# Altium PCB AD.PcbDoc
Units mm, origin at the board's own origin, x right, y up, seen from the top; angles counter-clockwise.
Board outline 100.31 x 90.32 mm, 2 copper layers (Top Layer, Bottom Layer); 9 components, 15 nets, 116 pads, 0 vias.
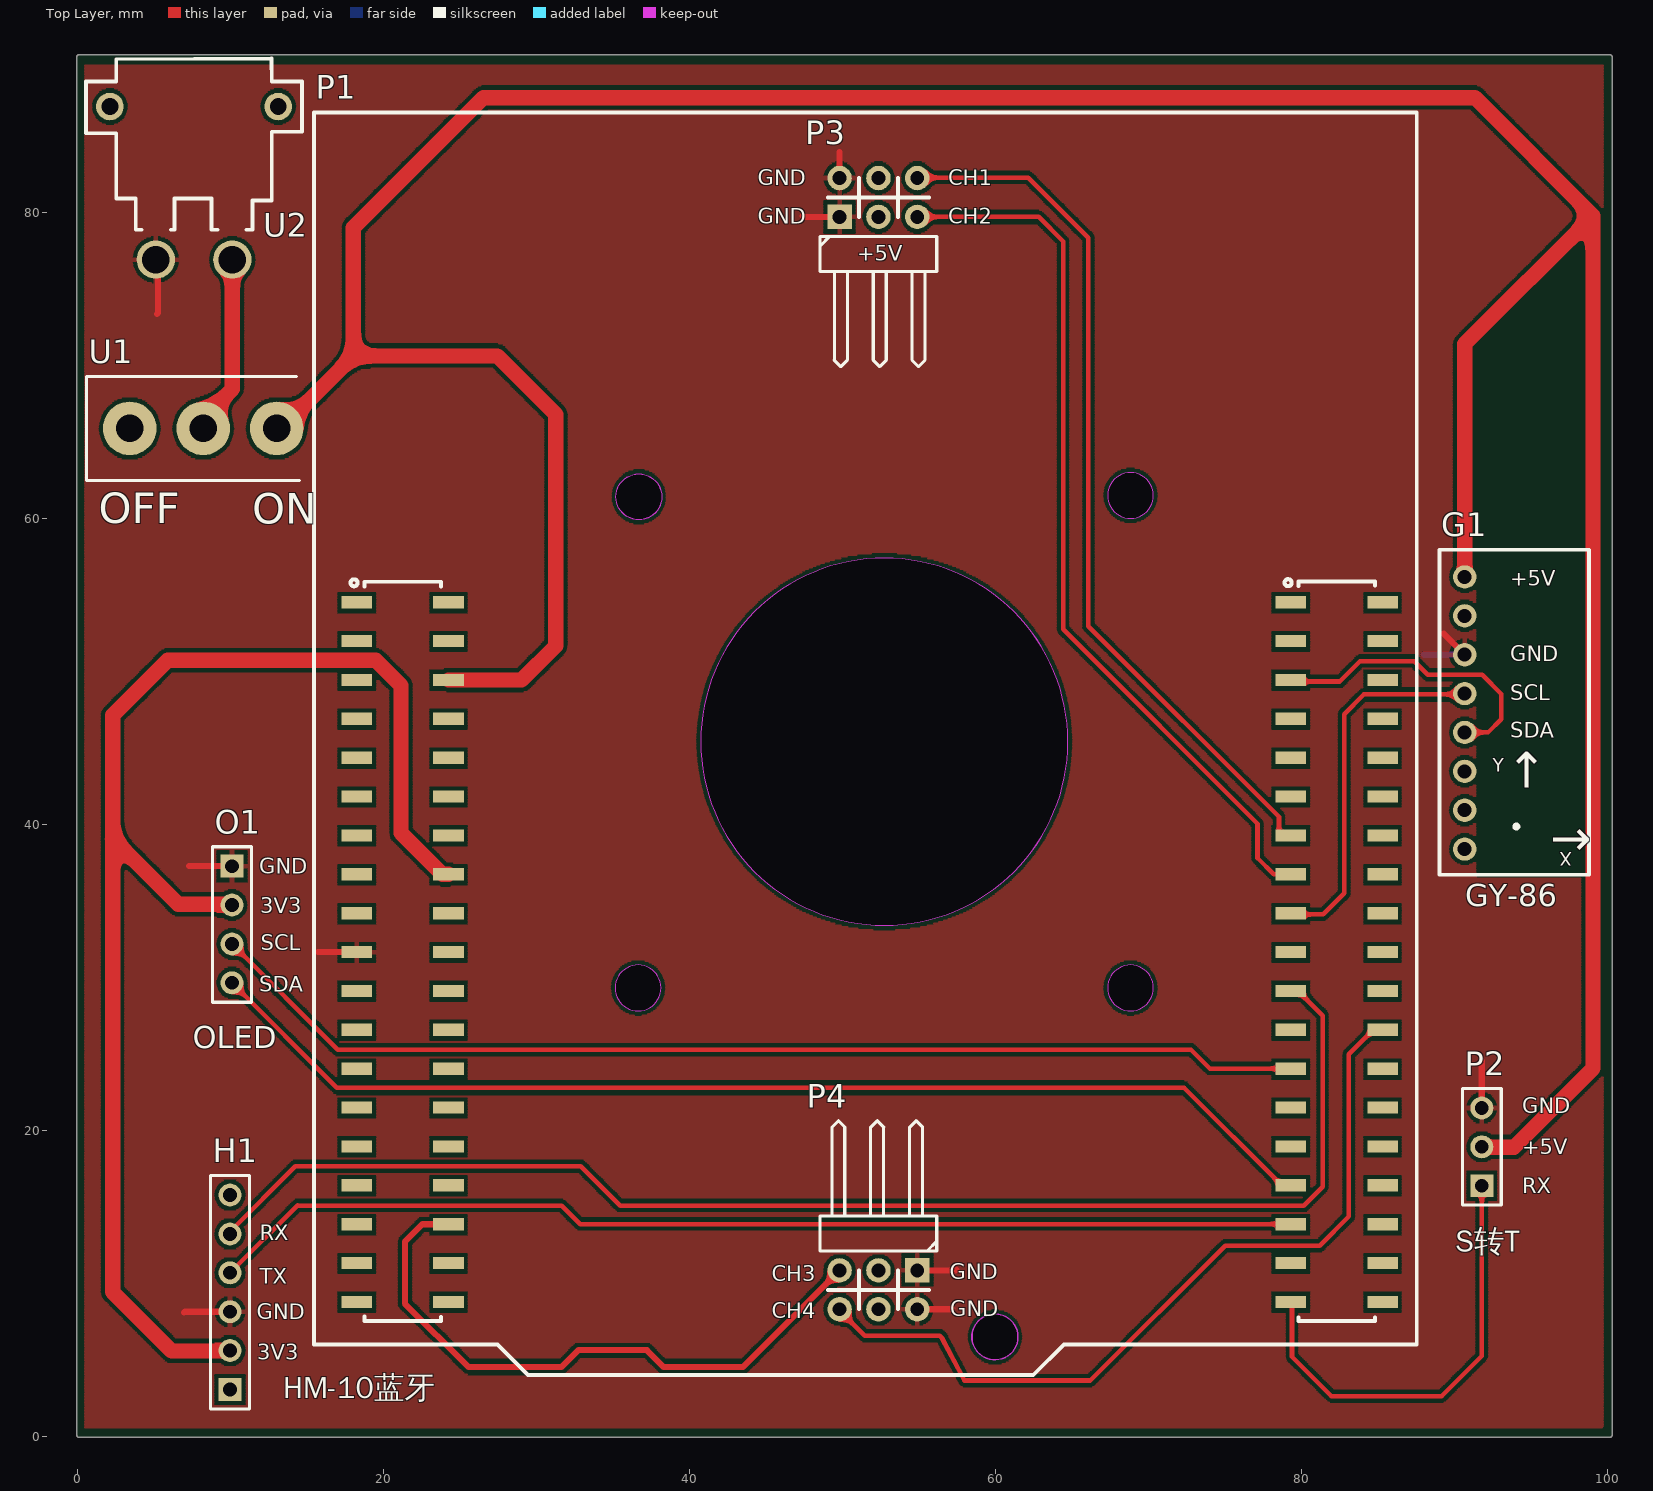
[diagram p0: Top Layer view]
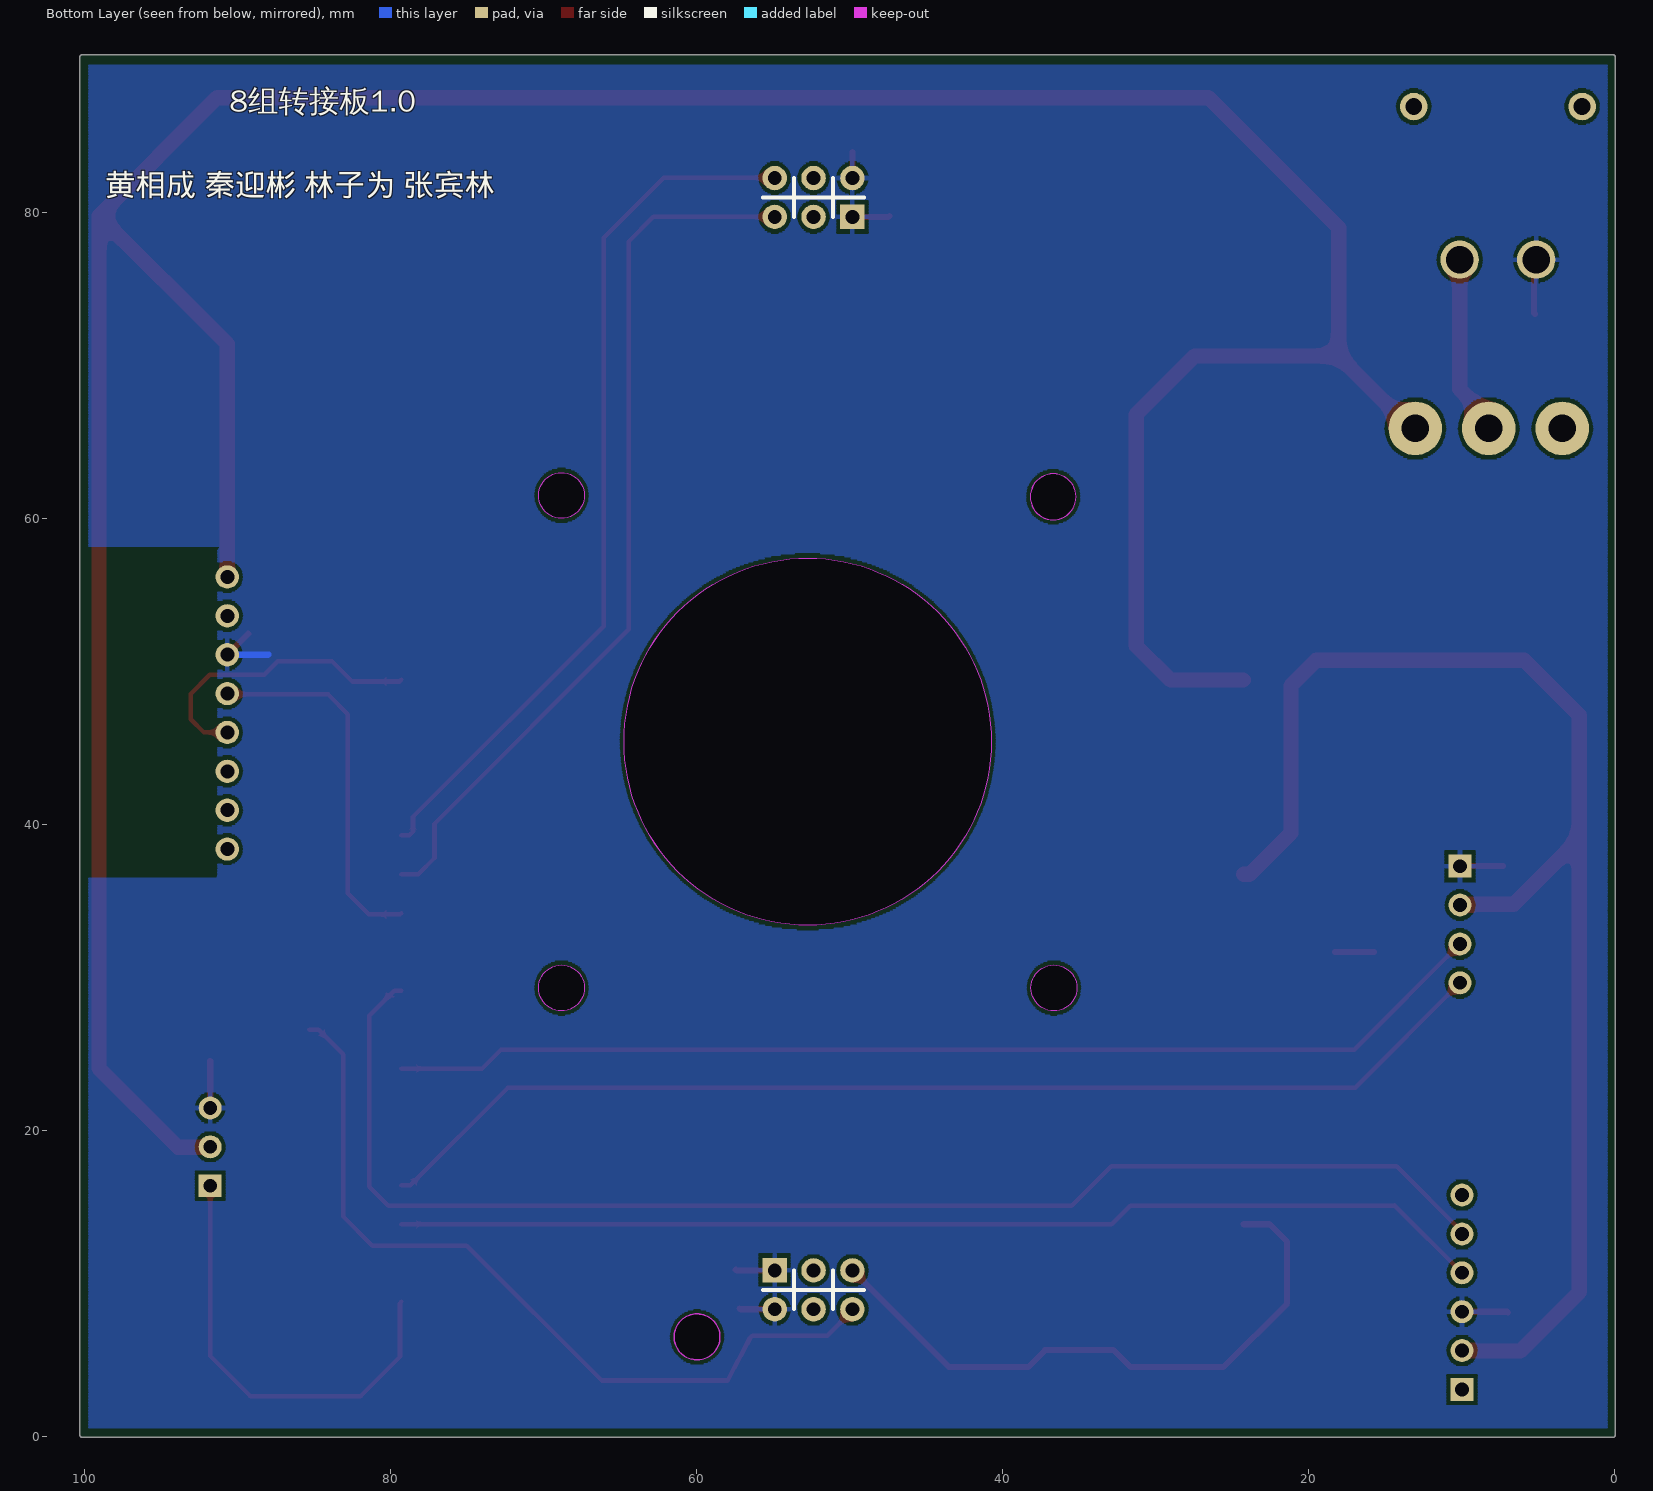
[diagram p1: Bottom Layer view, seen from below]

## Layer stack, top to bottom
Top Solder: solder mask 0.0102, Solder Resist, Dk 3.5
Top Layer: signal copper 0.0356
Dielectric 1: dielectric 0.32, FR-4, Dk 4.8
Bottom Layer: signal copper 0.0356
Bottom Solder: solder mask 0.0102, Solder Resist, Dk 3.5

## Board outline
-0.026,0.076 ccw(c0.102,0.076) 0.102,-0.051 100.152,-0.051 ccw(c100.152,0.076) 100.28,0.076 100.28,90.145 ccw(c100.152,90.145) 100.152,90.272 0.102,90.272 ccw(c0.102,90.145) -0.026,90.145
cut-out: 67.317,61.482 ccw(c68.817,61.482) 68.817,59.982 ccw(c68.817,61.482) 70.317,61.482 ccw(c68.817,61.482) 68.817,62.982 ccw(c68.817,61.482)
cut-out: 67.317,29.308 ccw(c68.817,29.308) 68.817,27.808 ccw(c68.817,29.308) 70.317,29.308 ccw(c68.817,29.308) 68.817,30.808 ccw(c68.817,29.308)
cut-out: 35.143,29.308 ccw(c36.643,29.308) 36.643,27.808 ccw(c36.643,29.308) 38.143,29.308 ccw(c36.643,29.308) 36.643,30.808 ccw(c36.643,29.308)
cut-out: 36.69,59.899 cw(c36.69,61.399) 35.19,61.399 cw(c36.69,61.399) 36.69,62.899 cw(c36.69,61.399) 38.19,61.399 cw(c36.69,61.399)
cut-out: 40.73,45.395 ccw(c52.73,45.395) 52.73,33.395 ccw(c52.73,45.395) 64.73,45.395 ccw(c52.73,45.395) 52.73,57.395 ccw(c52.73,45.395)
cut-out: 36.69,59.89 cw(c36.69,61.39) 35.19,61.39 cw(c36.69,61.39) 36.69,62.89 cw(c36.69,61.39) 38.19,61.39 cw(c36.69,61.39)
cut-out: 35.143,29.308 ccw(c36.643,29.308) 36.643,27.808 ccw(c36.643,29.308) 38.143,29.308 ccw(c36.643,29.308) 36.643,30.808 ccw(c36.643,29.308)
cut-out: 67.317,61.482 ccw(c68.817,61.482) 68.817,59.982 ccw(c68.817,61.482) 70.317,61.482 ccw(c68.817,61.482) 68.817,62.982 ccw(c68.817,61.482)
cut-out: 67.317,29.308 ccw(c68.817,29.308) 68.817,27.808 ccw(c68.817,29.308) 70.317,29.308 ccw(c68.817,29.308) 68.817,30.808 ccw(c68.817,29.308)
cut-out: 40.73,45.395 ccw(c52.73,45.395) 52.73,33.395 ccw(c52.73,45.395) 64.73,45.395 ccw(c52.73,45.395) 52.73,57.395 ccw(c52.73,45.395)

## Design rules (kind name [scope] priority, off if disabled: settings)
Clearance GND_Polygon_Clearance [InNet('GND')] p1: gap=0.25 ignorepadtopadclearanceinfootprint=FALSE
Clearance [All] p2: gap=0.3 ignorepadtopadclearanceinfootprint=FALSE
PolygonConnect PolygonGND [InNet('GND')] p1: connectstyle=Relief reliefconductorwidth=0.3 reliefentries=4 polygonreliefangle="90 Angle" airgapwidth=0.25
PolygonConnect [All] p2: connectstyle=Relief reliefconductorwidth=0.254 reliefentries=4 polygonreliefangle="90 Angle" airgapwidth=0.254
RoutingVias [All] p1: holewidth=0.305 width=0.61 viastyle="Through Hole" minholewidth=0.305 minwidth=0.61 maxholewidth=0.305 maxwidth=0.61
SolderMaskExpansion [All] p1: expansion=0.064 istentingtop=FALSE
SupplyNets "Schematic Supply Nets_2" [InNet('+3V3')] p1: voltage=0.000
SupplyNets "Schematic Supply Nets_1" [InNet('+5')] p2: voltage=0.000
SupplyNets "Schematic Supply Nets" [InNet('GND')] p3: voltage=0.000
Width Width_PWR [InNetClass('PWR')] p1: maxlimit=1.524 minlimit=0.305 preferedwidth=0.305
Width Width_INF [InNetClass('INF')] p2: maxlimit=0.4 minlimit=0.2 preferedwidth=0.2
Width Width_PWM [InNetClass('PWM')] p3: maxlimit=0.4 minlimit=0.2 preferedwidth=0.2
Width [All] p4: maxlimit=0.254 minlimit=0.254 preferedwidth=0.254
30 further rules are at their usual default settings.

## Classes and differential pairs
net class PWM: TIM3_CH1 TIM3_CH2 TIM3_CH3 TIM3_CH4
net class INF: I2C1_SCL I2C1_SDA I2C2_SCL I2C2_SDA USART1_RX USART1_TX USART2_RX
net class PWR: +3V3 +5 GND NetU1_2

## Components (designator, comment, footprint, x,y, rotation, side; value= is the part's Value field where it differs from the comment)
G1 "GY-86" GY-86 95.733,47.269 r0 top
H1 "HM-10" HDR1X6 9.982,3.073 r90 top
O1 "OLED" HDR1X4 10.109,37.262 r270 top
P1 "NUCLEO-64" NUCLEO-F103RB 87.568,86.508 r270 top
P2 "SBUS转TTL" HDR1X3 91.77,16.383 r90 top
P3 "PWM" HDR2.54-WI-2x3P 52.349,80.955 r0 top
P4 "PWM" HDR2.54-WI-2x3P 52.349,9.581 r180 top
U1 "SS12D06-开关" SS12D06开关 8.23,65.862 r90 top
U2 "XT30PW" XT-30PW 10.132,76.893 r180 top

## Footprints (in the part's own frame and the unit in brackets; to place one, negate y for a bottom-side part, rotate by r counter-clockwise, add the part's x,y. Pads: shape width x height; smd on the part's side, far side on the other; paste and mask are expansions set on the pad)
GY-86 [mil]
  round 60 hole 36: 1(-200,350) 2(-200,250) 3(-200,150) 4(-200,50) 5(-200,-50) 6(-200,-150) 7(-200,-250) 8(-200,-350)
  silkscreen extent -265,-416 120,420
HDR1X3 [mm] "Connector; Header; 3 Position"
  rect 1.5x1.5 hole 0.9: 1(0,0)
  round 1.5 hole 0.9: 2(2.54,0) 3(5.08,0)
  silkscreen extent -1.27,-1.27 6.35,1.27, body extent -1.27,-1.27 6.35,1.27, height 8.5
HDR1X4 [mm] "Connector; Header; 4 Position"
  rect 1.5x1.5 hole 0.9: 1(0,0)
  round 1.5 hole 0.9: 2(2.54,0) 3(5.08,0) 4(7.62,0)
  silkscreen extent -1.27,-1.27 8.89,1.27
HDR1X6 [mm] "Connector; Header; 6 Position"
  rect 1.5x1.5 hole 0.9: 1(0,0)
  round 1.5 hole 0.9: 2(2.54,0) 3(5.08,0) 4(7.62,0) 5(10.16,0) 6(12.7,0)
  silkscreen extent -1.27,-1.27 13.97,1.27, body extent -1.27,-1.27 13.97,1.27, height 8.5
HDR2.54-WI-2x3P [mm] "双排弯脚排针，3x2脚"
  rect 1.6x1.6 hole 0.9: 1(-2.54,-1.27)
  round 1.6 hole 0.9: 2(-2.54,1.27) 3(0,-1.27) 4(0,1.27) 5(2.54,-1.27) 6(2.54,1.27)
  silkscreen extent -3.81,-11.06 3.81,1.27, body extent -3.81,-10.49 3.81,2.36, height 5.1
NUCLEO-F103RB [mm]
  rect 0.8x2 smd paste+0 mask+0.051: 1(32,-69.308) 2(32,-63.308) 3(34.54,-69.308) 4(34.54,-63.308) 5(37.08,-69.308) 6(37.08,-63.308) 7(39.62,-69.308) 8(39.62,-63.308) 9(42.16,-69.308) 10(42.16,-63.308) 11(44.7,-69.308) 12(44.7,-63.308) 13(47.24,-69.308) 14(47.24,-63.308) 15(49.78,-69.308) 16(49.78,-63.308) 17(52.32,-69.308) 18(52.32,-63.308) 19(54.86,-69.308) 20(54.86,-63.308) 21(57.4,-69.308) 22(57.4,-63.308) 23(59.94,-69.308) 24(59.94,-63.308) 25(62.48,-69.308) 26(62.48,-63.308) 27(65.02,-69.308) 28(65.02,-63.308) 29(67.56,-69.308) 30(67.56,-63.308) 31(70.1,-69.308) 32(70.1,-63.308) 33(72.64,-69.308) 34(72.64,-63.308) 35(75.18,-69.308) 36(75.18,-63.308) 37(77.72,-69.308) 38(77.72,-63.308) 73(31.995,-8.282) 74(31.995,-2.282) 75(34.535,-8.282) 76(34.535,-2.282) 77(37.075,-8.282) 78(37.075,-2.282) 79(39.615,-8.282) 80(39.615,-2.282) 81(42.155,-8.282) 82(42.155,-2.282) 83(44.695,-8.282) 84(44.695,-2.282) 85(47.235,-8.282) 86(47.235,-2.282) 87(49.775,-8.282) 88(49.775,-2.282) 89(52.315,-8.282) 90(52.315,-2.282) 91(54.855,-8.282) 92(54.855,-2.282) 93(57.395,-8.282) 94(57.395,-2.282) 95(59.935,-8.282) 96(59.935,-2.282) 97(62.475,-8.282) 98(62.475,-2.282) 99(65.015,-8.282) 100(65.015,-2.282) 101(67.555,-8.282) 102(67.555,-2.282) 103(70.095,-8.282) 104(70.095,-2.282) 105(72.635,-8.282) 106(72.635,-2.282) 107(75.175,-8.282) 108(75.175,-2.282) 109(77.715,-8.282) 110(77.715,-2.282)
  Keep-Out Layer board cut-out: 81.5,-27.608 81.5,-27.756 81.442,-28.046 81.329,-28.319 81.165,-28.564 80.956,-28.773 80.71,-28.938 80.437,-29.051 80.148,-29.108 79.852,-29.108 79.562,-29.051 79.289,-28.938 79.044,-28.773 78.835,-28.564 78.671,-28.319 78.557,-28.046 78.5,-27.756 78.5,-27.608 78.5,-27.461 78.557,-27.171 78.671,-26.898 78.835,-26.652 79.044,-26.443 79.289,-26.279 79.562,-26.166 79.852,-26.108 80.148,-26.108 80.437,-26.166 80.71,-26.279 80.956,-26.443 81.165,-26.652 81.329,-26.898 81.442,-27.171 81.5,-27.461 81.5,-27.608 81.5,-27.608
  Keep-Out Layer circle w0.003: c80,-27.608 r1.5
  Keep-Out Layer region: 81.5,-27.608 81.49,-27.782 81.459,-27.954 81.409,-28.121 81.34,-28.281 81.253,-28.433 81.149,-28.572 81.029,-28.699 80.896,-28.811 80.75,-28.907 80.594,-28.986 80.43,-29.045 80.26,-29.085 80.087,-29.106 79.913,-29.106 79.739,-29.085 79.57,-29.045 79.406,-28.986 79.25,-28.907 79.104,-28.811 78.97,-28.699 78.851,-28.572 78.747,-28.433 78.659,-28.281 78.59,-28.121 78.54,-27.954 78.51,-27.782 78.5,-27.608 78.51,-27.434 78.54,-27.262 78.59,-27.095 78.659,-26.935 78.747,-26.784 78.851,-26.644 78.97,-26.517 79.104,-26.405 79.25,-26.309 79.406,-26.231 79.57,-26.171 79.739,-26.131 79.913,-26.111 80.087,-26.111 80.26,-26.131 80.43,-26.171 80.594,-26.231 80.75,-26.309 80.896,-26.405 81.029,-26.517 81.149,-26.644 81.253,-26.784 81.34,-26.935 81.409,-27.095 81.459,-27.262 81.49,-27.434 81.5,-27.608
  Keep-Out Layer region: 81.5,-27.608 81.5,-27.756 81.442,-28.046 81.329,-28.319 81.165,-28.564 80.956,-28.773 80.71,-28.938 80.437,-29.051 80.148,-29.108 79.852,-29.108 79.562,-29.051 79.289,-28.938 79.044,-28.773 78.835,-28.564 78.671,-28.319 78.557,-28.046 78.5,-27.756 78.5,-27.608 78.5,-27.461 78.557,-27.171 78.671,-26.898 78.835,-26.652 79.044,-26.443 79.289,-26.279 79.562,-26.166 79.852,-26.108 80.148,-26.108 80.437,-26.166 80.71,-26.279 80.956,-26.443 81.165,-26.652 81.329,-26.898 81.442,-27.171 81.5,-27.461 81.5,-27.608 81.5,-27.608
  silkscreen extent 0,-72.11 82.5,-0.05
SS12D06开关 [mm]
  round 3.5 hole 1.8 paste-2539.97 mask+0.102: 1(0,4.8) 2(0,0) 3(0,-4.8)
  silkscreen extent -3.4,-6.3 3.4,7.62
XT-30PW [mm]
  round 2.5 hole 1.8 paste-2539.97 mask+0.051: 1(5,0) 2(0,0)
  round 1.8 hole 1.1 paste-2539.97 mask+0.051: 3(8,-10) 4(-3,-10)
  silkscreen extent -4.55,-13.15 9.55,-1.95

## Part data
G1: "GY-86模块", AddInBom=yes, Device=GY-86, FootprintName=GY-86, Symbol=GY-86
H1: "HM-10蓝牙模块", LatestRevisionDate=17-Jul-2002, LatestRevisionNote="Re-released for DXP Platform.", Publisher="Altium Limited"
O1: "使用I2C通信的0.96寸OLED模块", LatestRevisionDate=17-Jul-2002, LatestRevisionNote="Re-released for DXP Platform.", Publisher="Altium Limited"
P1: "STM32F401NUCLEO开发板", Manufacturer=ST, AddInBom=yes, Device=NUCLEO-64, FootprintName=NUCLEO-F103RB, Supplier=Mouser, SupplierPart=NUCLEO-F103rb, Symbol=NUCLEO-64
P2: "SBUS转TTL模块", LatestRevisionDate=17-Jul-2002, LatestRevisionNote="Re-released for DXP Platform.", Publisher="Altium Limited"
P3 P4: "电机PWM输出", LatestRevisionDate=17-Jul-2002, LatestRevisionNote="Re-released for DXP Platform.", Publisher="Altium Limited"
U1: library part SS12D06, "SS12D06开关", AddInBom=yes, Device=SS12D06-开关, FootprintName=SS12D06开关, OriginFootprint=SS12D06开关, Symbol=SS12D06-开关
U2: "XT-30插头", AddInBom=yes, Device=XT30PW, FootprintName=XT-30PW, OriginFootprint=XT-30PW, Symbol=XT30PW

## Nets (pads, with @x,y where several pads share a name; then routed paths per layer and width w, separated by ;. In a path a pad name is that pad's centre, name@x,y a point inside that pad or via, vN(x,y) a via of type N, cw(c..) or ccw(c..) an arc to the next point about the centre after c; other vN are vias at no path point)
+3V3: H1.2 O1.2 P1.16 | length 91.4
  Top Layer w1: H1.2 9.957,5.588 6.172,5.588 2.311,9.449 2.311,39.065 ; O1.2 10.058,34.773 6.604,34.773 2.311,39.065 ; P1.16 23.86,36.728 21.158,39.43 21.158,49.062 19.496,50.724 5.918,50.724 2.311,47.117 2.311,39.065
+5: G1.1 P1.6 P2.2 U1.3 | length 233.1
  Top Layer w1: U1.3 13.309,65.862 18.041,70.594 ; P1.6 29.032,49.428 31.267,51.664 31.267,66.777 27.45,70.594 18.041,70.594 ; G1.1 90.653,71.374 99.035,79.756 ; P2.2 91.796,18.898 93.878,18.898 99.035,24.054 99.035,79.756 ; 18.041,70.594 18.041,78.976 26.542,87.478 91.313,87.478 99.035,79.756
GND: G1.3 H1.3 O1.1 P1.19 P2.3 P3.1 P3.2 P4.1 P4.2 U2.1 | length 28.3
  Top Layer w0.4: 5.207,73.33 5.284,73.407 U2.1@5.284,76.512 ; 6.985,8.103 7.036,8.153 H1.3 ; 7.315,37.262 O1.1 ; 15.723,31.648 P1.19 ; 47.396,79.731 47.442,79.685 P3.1 ; P3.2 49.809,83.922 ; P4.2 57.129,8.311 57.175,8.357 ; P4.1 57.383,10.851 57.429,10.897 ; 89.281,52.451 G1.3 ; P2.3 91.77,24.536
  Bottom Layer w0.4: 87.96,51.105 87.986,51.079 G1.3
I2C1_SCL: G1.4 P1.89 | length 24.2
  Top Layer w0.3: P1.89 79.367,34.112 81.407,34.112 82.779,35.484 82.779,47.193 84.066,48.48 84.066,48.489 90.602,48.489 G1.4
I2C1_SDA: G1.5 P1.77 | length 19.6
  Top Layer w0.3: P1.77 79.393,49.327 82.489,49.327 83.811,50.65 87.358,50.65 88.249,49.759 91.796,49.759 93.04,48.514 93.04,46.863 92.177,45.999 G1.5
I2C2_SCL: O1.3 P1.97 | length 72.6
  Top Layer w0.3: O1.3 17.018,25.273 72.771,25.273 74.011,24.033 P1.97
I2C2_SDA: O1.4 P1.103 | length 74.7
  Top Layer w0.3: O1.4 16.967,22.784 72.316,22.784 78.686,16.413 P1.103
NetU1_2: U1.2 U2.2 | length 11.8
  Top Layer w1: U1.2 8.23,66.539 10.132,68.441 U2.2
TIM3_CH1: P1.85 P3.6 | length 57.6
  Top Layer w0.3: P3.6 54.914,82.249 62.128,82.249 66.065,78.312 66.065,52.942 78.518,40.49 78.518,39.523 78.768,39.273 P1.85
TIM3_CH2: P1.87 P3.5 | length 58.3
  Top Layer w0.3: P3.5 62.809,79.685 64.414,78.08 64.414,52.731 77.114,40.031 77.114,37.795 78.176,36.733 P1.87
TIM3_CH3: P1.34 P4.5 | length 41
  Top Layer w0.4: P1.34 22.555,13.868 21.412,12.725 21.412,8.687 25.552,4.547 31.648,4.547 32.741,5.639 37.211,5.639 38.303,4.547 43.505,4.547 P4.5
TIM3_CH4: P1.96 P4.6 | length 53.7
  Top Layer w0.3: P4.6 49.809,8.23 51.46,6.579 56.364,6.579 56.452,6.491 56.484,6.459 57.964,3.658 66.192,3.658 75.006,12.471 81.178,12.471 83.083,14.376 83.083,24.971 84.686,26.573 P1.96
USART1_RX: H1.4 P1.105 | length 71.6
  Top Layer w0.3: H1.4 14.402,15.113 14.427,15.088 31.648,15.088 32.863,13.873 P1.105
USART1_TX: H1.5 P1.93 | length 88.8
  Top Layer w0.3: H1.5 9.982,13.386 14.249,17.653 32.902,17.653 35.477,15.078 80.127,15.078 81.368,16.319 81.368,27.499 79.754,29.113 P1.93
USART2_RX: P1.109 P2.1 | length 29.3
  Top Layer w0.3: P1.109 79.368,8.711 79.368,5.214 81.94,2.642 89.154,2.642 91.77,5.258 P2.1
pads on no net: G1.2 G1.6 G1.7 G1.8 H1.1 H1.6 P1.1 P1.2 P1.3 P1.4 P1.5 P1.7 P1.8 P1.9 P1.10 P1.11 P1.12 P1.13 P1.14 P1.15 P1.17 P1.18 P1.20 P1.21 P1.22 P1.23 P1.24 P1.25 P1.26 P1.27 P1.28 P1.29 P1.30 P1.31 P1.32 P1.33 P1.35 P1.36 P1.37 P1.38 P1.73 P1.74 P1.75 P1.76 P1.78 P1.79 P1.80 P1.81 P1.82 P1.83 P1.84 P1.86 P1.88 P1.90 P1.91 P1.92 P1.94 P1.95 P1.98 P1.99 P1.100 P1.101 P1.102 P1.104 P1.106 P1.107 P1.108 P1.110 P3.3 P3.4 P4.3 P4.4 U1.1 U2.3 U2.4

## Polygon pours and split planes (outlines as drawn)
GND on Top Layer "GND_L01_P000" (hatched Horizontal grid 0.102 track 0.127, remove dead copper, pour order 0): 0.508,89.662 99.695,89.662 99.695,0.66 99.543,0.508 0.508,0.508 0.508,89.687
GND on Bottom Layer "GND_L02_P001" (hatched Horizontal grid 0.102 track 0.127, remove dead copper, pour order 1): 0.504,89.651 0.515,89.662 99.695,89.662 99.695,0.483 99.67,0.508 0.508,0.508 0.508,89.662

## Other copper
Top Layer:
  pour cut-out: 91.415,58.064 91.44,58.039 91.44,36.576 100.406,36.576 100.482,36.652 100.482,58.039 91.415,58.039
Bottom Layer:
  pour cut-out: 91.262,58.014 91.338,57.937 91.338,36.576 100.33,36.576 100.355,36.551 100.355,58.039 91.262,58.039 91.211,58.09

## Silkscreen, mask and mechanical layers (free items; w line width, h text height)
Top Overlay:
  text "GND" at 44.475,81.763 h1
  text "CH1" at 56.921,81.763 h1
  text "GND" at 44.475,79.223 h1
  text "CH2" at 56.921,79.223 h1
  text "+5V" at 50.952,76.81 h1
  text "OFF" at 1.397,59.665 h2
  text "ON" at 11.43,59.639 h2
  text "+5V" at 93.624,55.575 h1
  text "GND" at 93.624,50.648 h1
  text "SCL" at 93.624,48.108 h1
  text "SDA" at 93.624,45.644 h1
  text "GND" at 11.887,36.754 h1
  text "3V3" at 11.963,34.188 h1
  text "GY-86" at 90.703,34.163 h2.5
  text "SCL" at 11.989,31.775 h1
  text "SDA" at 11.887,29.058 h1
  text "OLED" at 7.544,24.868 h2.5
  text "GND" at 94.412,21.107 h1
  text "+5V" at 94.412,18.44 h1
  text "RX" at 94.412,15.9 h1
  text "RX" at 11.913,12.827 h1
  text "S转T" at 90.043,11.572 h2.5
  text "GND" at 57.023,10.287 h1
  text "CH3" at 45.364,10.135 h1
  text "TX" at 11.913,9.982 h1
  text "GND" at 57.048,7.849 h1
  text "CH4" at 45.364,7.722 h1
  text "GND" at 11.735,7.645 h1
  text "3V3" at 11.76,5.004 h1
  text "HM-10蓝牙" at 13.462,2.013 h2.5
Bottom Overlay:
  text "8组转接板1.0" at 90.5,86.062 h2.5
  text "黄相成 秦迎彬 林子为 张宾林" at 98.628,80.592 h2.5
Mechanical 1:
  circle w0.254: c68.817,61.482 r1.5
  circle w0.254: c68.817,29.308 r1.5
  circle w0.254: c36.643,29.308 r1.5
  circle w0.254: c36.69,61.399 r1.5
  circle w0.254: c52.73,45.395 r12
  pour cut-out: 40.73,45.395 ccw(c52.73,45.395) 52.73,33.395 ccw(c52.73,45.395) 64.73,45.395 ccw(c52.73,45.395) 52.73,57.395 ccw(c52.73,45.395)
  lines w0.254: 100.203,-0.025 0.203,-0.025 -0.102,-0.025 -0.102,0.025 -0.102,90.025 -0.102,90.272 99.898,90.272 100.305,90.272 100.305,90.094 100.305,0.094

## Dimensions
-0.026,0.076 to -0.102,90.025 on Top Overlay
0.102,-0.051 to 100.152,-0.051 on Top Overlay

## Text inside footprints (layer, text, board x,y; h text height)
G1: Top Overlay "↑" at 95.658,40.33 h4 r270; Top Overlay "X" at 97.69,38.456 h1.5 r180; Top Overlay "↑" at 93.372,41.6 h4; Top Overlay "Y" at 92.483,43.124 h1.5